# Altium PCB 400921.PcbDoc (part 3 of 3)
Units mm, origin at the board's own origin, x right, y up, seen from the top; angles counter-clockwise.
Board outline 33 x 32.99 mm, 4 copper layers (Top Layer, Mid-Layer 1, Mid-Layer 2, Bottom Layer), stack 0.75 mm thick; 113 components, 68 nets, 329 pads, 369 vias.
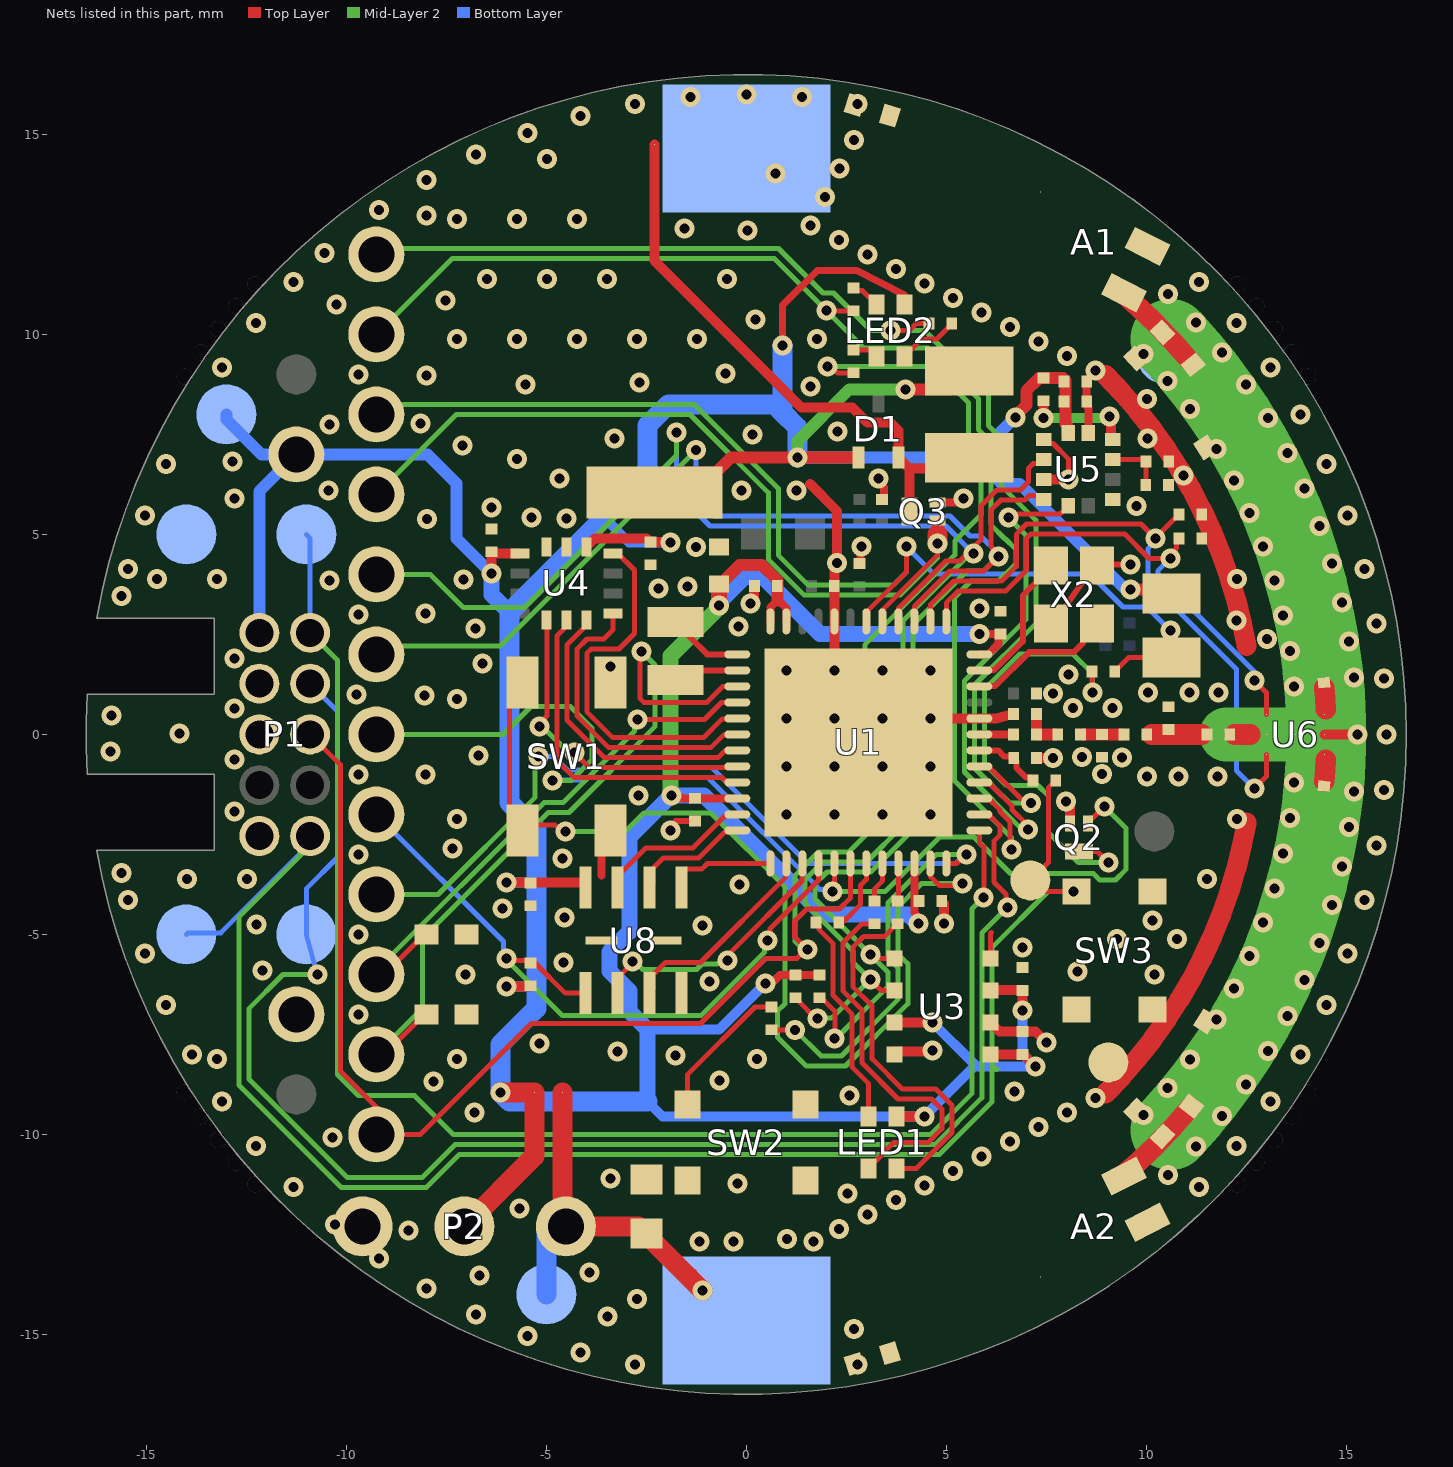
[diagram p4: the nets of this part, all layers, seen from the top]

## Via types
v1: diameter 0.5, hole 0.25, Top Layer to Bottom Layer, tented both sides, 369 vias

## Nets (pads, with @x,y where several pads share a name; then routed paths per layer and width w, separated by ;. In a path a pad name is that pad's centre, name@x,y a point inside that pad or via, vN(x,y) a via of type N, cw(c..) or ccw(c..) an arc to the next point about the centre after c; other vN are vias at no path point) (continued)
GND: A1.2 A2.2 Bat1.2 C1.1 C2.1 C3.1 C4.2 C5.1 C6.1 C7.2 C8.2 C9.1 C10.2 C11.1 C12.1 C13.1 C15.1 C16.1 C17.2 C18.1 C19.2 C20.1 C21.1 C22.1 C23.1 C24.1 C26.1 C27.1 C30.1 C31.1 C38.2 C39.1 C41.1 C42.1 GND.1 P1.3 P1.5 P1.9 P2.3 Q2.2 Q3.2 R8.1 R9.1 SW1.1 SW2.2 SW3.1 TP2.1 TP7.1 TP13.1 U1.32 U1.44 U1.49 U3.1 U3.5 U3.7 U4.6 U4.7 U5.1 U5.3 U5.7 U5.11 U6.5 U6.7 U8.4 U8.9 X2.2 X2.4 | length 63
  Top Layer w0.125: U3.5@6.1,-5.6 6.1,-4.975 6.125,-4.95 ; U5.1@7.44,7.375 7.542,7.273 7.668,7.273 8.05,6.89 v1(8.05,6.375)
  Top Layer w0.15: v1@-1.85,-2.25 -1.766,-2.166 C7.2@-1.287,-2.166 -1.302,-2.166 C7.2@-1.362,-2.226 ; X2.4@7.612,2.779 7.962,3.179 8.412,3.829 X2.2@8.762,4.229 ; X2.2@8.762,4.204 8.808,4.25 v1(9.6,4.25)
  Top Layer w0.2: -3.625,-3.525 -3.625,-2.625 SW1.1@-3.4,-2.4 ; C12.1@2.828,4.272 2.853,4.297 2.853,4.673 v1(2.879,4.698) ; v1(3.3,6.4) 3.3,6.319 3.44,6.179 C2.1@3.44,5.907 ; Q3.2@4.775,5.8 v1@5.425,5.8 ; C22.1@8.51,8.825 C21.1@8.51,8.325 8.545,8.29 8.545,8.163 8.55,8.158 U5.11@8.55,7.535 8.55,8.135
  Top Layer w0.25: v1(0.11,3.276) 0.11,3.343 0.196,3.429 0.196,3.697 C10.2@0.206,3.707 ; 1.59,6.265 2.269,5.587 2.269,4.224 2.21,4.165 2.21,3.719 C1.1@2.2,3.709 U1.44@2.2,2.825 v1(2.2,1.6) ; U3.1@3.7,-7.925 v1@4.65,-7.925 ; U1.49@4.603,0.4 U1.32@5.825,0.4 6.254,0.4 C6.1@6.681,0.514 ; C8.2@4.889,-4.162 4.889,-4.177 4.937,-4.225 v1(4.937,-4.725) ; U3.7@6.1,-7.2 6.33,-7.43 C16.1@6.9,-7.43 7.23,-7.43 v1(7.5,-7.7) ; C13.1@7.258,-0.586 v1@7.661,-0.586 ; U5.3@7.44,6.375 v1(8.05,6.375) ; Q2.2@8.087,-2.225 v1@8.087,-1.739 ; U6.5@14.45,0 v1(15.275,0)
  Top Layer w0.5: 8.98,-8.98 ccw(c0,0) 12.507,-2.205 ; 8.98,8.98 cw(c0,0) 12.507,2.205
  Mid-Layer 2 w1.35: 12.001,0 14.5,0
  Mid-Layer 2 w2: 10.605,-9.889 ccw(c0,0) 10.605,9.889
  other v1: -2.778,-15.757 2.778,-15.757 -4.141,-15.455 -5.472,-15.035 2.689,-14.863 -3.475,-14.55 -6.762,-14.501 -2.732,-14.118 -8,-13.856 -6.675,-13.525 -3.925,-13.45 -9.177,-13.106 -1.175,-12.675 -0.325,-12.675 1.675,-12.675 1.018,-12.618 -8.45,-12.4 2.313,-12.362 -10.285,-12.257 3.026,-11.999 -5.675,-11.85 3.738,-11.635 2.525,-11.475 -11.314,-11.314 11.314,-11.314 4.451,-11.272 -0.225,-11.225 -3.4,-11.1 10.546,-11.016 5.164,-10.909 5.877,-10.546 11.243,-10.303 -12.257,-10.285 12.257,-10.285 6.59,-10.183 -10.35,-10.075 7.303,-9.82 11.893,-9.545 9.932,-9.508 -6.8,-9.45 8.015,-9.456 -13.106,-9.177 13.106,-9.177 8.728,-9.093 2.575,-9.025 6.7,-8.925 10.533,-8.838 12.492,-8.747 -7.825,-8.675 -0.675,-8.65 11.089,-8.13 -13.232,-8.118 -7.232,-8.118 0.268,-8.118 -1.775,-8.025 -13.856,-8 13.856,-8 -3.225,-7.925 4.65,-7.9 13.037,-7.911 -5.175,-7.725 11.755,-7.133 13.527,-7.042 -9.7,-7 -14.501,-6.762 14.501,-6.762 12.196,-6.349 -0.925,-6.175 13.958,-6.142 -7.025,-6 10.2,-6 8.275,-5.925 -12.1,-5.9 -4.575,-5.7 12.586,-5.538 -15.035,-5.472 15.035,-5.472 6.9,-5.325 14.33,-5.216 9.268,-5.118 10.768,-5.118 -9.7,-5 -1.1,-4.775 -12.25,-4.75 12.921,-4.703 10.15,-4.65 -4.55,-4.575 -6.1,-4.35 14.641,-4.267 -15.455,-4.141 15.455,-4.141 13.201,-3.848 -0.175,-3.75 -13.982,-3.618 -12.482,-3.618 11.518,-3.618 -15.621,-3.463 14.888,-3.301 -4.6,-3.1 -9.7,-3 13.424,-2.976 -7.35,-2.85 15.757,-2.778 -1.9,-2.4 15.072,-2.32 -7.232,-2.118 12.268,-2.118 13.59,-2.092 1,-2 2.2,-2 3.4,-2 4.6,-2 -12.8,-1.925 7.988,-1.676 -2.7,-1.525 15.192,-1.429 15.939,-1.394 13.698,-1.198 10.016,-1.05 10.803,-1.05 11.775,-1.05 -9.7,-1 -8.025,-1 8.898,-0.989 1,-0.8 2.2,-0.8 3.4,-0.8 4.6,-0.8 -12.8,-0.625 7.666,-0.591 8.391,-0.56 9.394,-0.571 -6.7,-0.525 -15.9,-0.425 16,0 -14.175,0.025 1,0.4 2.2,0.4 3.4,0.4 4.6,0.4 -15.875,0.475 -12.8,0.65 8.162,0.659 9.152,0.659 -7.232,0.882 -8.05,0.975 -9.75,1 7.666,1.02 10.041,1.05 11.075,1.05 11.8,1.05 13.698,1.198 15.939,1.394 15.192,1.429 8.06,1.498 1,1.6 3.4,1.6 4.6,1.6 -3.4,1.7 -6.6,1.775 -12.8,1.9 13.59,2.092 15.072,2.32 13.018,2.382 -6.775,2.65 -0.2,2.702 15.757,2.778 12.25,2.85 13.424,2.976 -9.7,3 -8.025,3.025 5.825,3.149 14.888,3.301 -15.621,3.463 -2.2,3.65 -1.475,3.7 -10.425,3.85 13.201,3.848 -14.732,3.882 -13.232,3.882 -7.075,3.875 12.268,3.882 -15.455,4.141 15.455,4.141 14.641,4.267 2.269,4.292 -1.263,4.685 12.921,4.703 14.33,5.216 -7.982,5.382 -4.5,5.4 -5.375,5.425 -15.035,5.472 15.035,5.472 12.586,5.538 -6.375,5.675 9.75,5.707 -12.8,5.9 5.425,5.9 -10.45,6.1 -0.125,6.1 1.25,6.1 13.958,6.142 12.196,6.349 -4.675,6.4 10.926,6.474 -14.501,6.762 14.501,6.762 -12.85,6.825 -5.732,6.882 13.527,7.042 11.755,7.133 -7.1,7.225 -3.3,7.4 10.025,7.4 0.15,7.5 2.275,7.575 -10.425,7.75 -8.15,7.775 13.037,7.911 13.856,8 11.089,8.13 10.018,8.382 1.6,8.7 -5.525,8.75 12.492,8.747 -2.675,8.8 10.533,8.838 -8,8.975 -9.7,9 -0.525,9.025 8.728,9.093 -13.106,9.177 -13.106,9.177 13.106,9.177 8.015,9.456 9.932,9.508 11.893,9.545 7.303,9.82 -7.232,9.882 -5.732,9.882 -4.232,9.882 -2.732,9.882 -1.232,9.882 1.768,9.882 6.59,10.183 -12.257,10.285 -12.257,10.285 12.257,10.285 11.243,10.303 0.225,10.375 5.877,10.546 -10.25,10.75 -7.525,10.85 5.164,10.909 10.546,11.016 4.451,11.272 -11.314,11.314 11.314,11.314 -6.482,11.382 -4.982,11.382 -3.482,11.382 -0.482,11.382 3.738,11.635 3.026,11.999 -10.55,12.029 2.313,12.362 0.025,12.6 -1.55,12.65 1.6,12.725 -7.232,12.882 -5.732,12.882 -4.232,12.882 -8,12.975 -9.177,13.106 1.963,13.438 -8,13.856 0.725,14.025 2.326,14.151 -4.982,14.382 -6.762,14.501 2.69,14.863 -5.472,15.035 -4.141,15.455 -2.778,15.757 2.778,15.757 -1.394,15.939 1.394,15.939 0,16
J1: C29.2 U6.6 | length 0.5
  Top Layer w0.517: C29.2@14.453,1.171 cw(c0,0) 14.486,0.634
J2: C25.2 U6.4 | length 0.5
  Top Layer w0.517: C25.2@14.453,-1.171 ccw(c0,0) 14.486,-0.634
NetA1_1: A1.1 C31.2 L7.2 | length 2.5
  Top Layer w0.517: A1.1@9.34,11.091 cw(c0,0) L7.2@11.102,9.327
NetA1_3: A1.3 C42.2
NetA2_1: A2.1 C27.2 C40.2 | length 2.5
  Top Layer w0.517: A2.1@9.34,-11.091 ccw(c0,0) C40.2@11.102,-9.327
NetA2_3: A2.3 C41.2
NetBz1_2: Bz1.2 D1.2 L6.1 Q3.3 | length 14.5
  Top Layer w0.25: Bz1.2@-2.3,14.75 -2.3,11.85 1.375,8.175 2.65,8.175 3.025,7.8 3.6,7.8 3.8,7.6 D1.2@3.8,6.925 4.075,6.65 ; Q3.3@4.075,5.575 4.075,6.65 ; L6.1@5.575,6.915 5.31,6.65 4.075,6.65
NetC6_2: C6.2 L2.2 L3.1 | length 0.9
  Top Layer w0.27: L2.2@7.253,0.014 C6.2@7.253,0.507
  Top Layer w0.3: L2.2@7.28,-0.001 L3.1@7.73,-0.001
NetC9_2: C9.2 L3.2 L4.1 | length 1
  Top Layer w0.3: L3.2@8.391,-0.001 C9.2@8.898,-0.001 L4.1@9.406,-0.001
NetC13_2: C13.2 R1.1 U1.30 | length 1.7
  Top Layer w0.15: U1.30@5.825,-0.4 6.297,-0.4 6.452,-0.555 6.635,-0.555 C13.2@6.685,-0.605 ; C13.2@6.684,-0.613 6.7,-0.613 6.755,-0.669 6.755,-0.74 6.757,-0.742 6.757,-0.843 6.996,-1.082 R1.1@7.136,-1.082
NetL2_1: L2.1 U1.31 | length 0.9
  Top Layer w0.2: U1.31@5.825,0 6.682,0 L2.1@6.683,-0.001
NetLED1_1: LED1.1 R13.2 | length 5.4
  Top Layer w0.125: R13.2@1.74,-4.7 1.812,-4.772 1.812,-4.871 2.162,-5.221 2.162,-6.513 2.646,-6.997 2.646,-8.318 3.05,-8.722 LED1.1@3.05,-9.55
NetLED1_2: LED1.2 R12.2 | length 9.3
  Top Layer w0.125: LED1.2@3.75,-10.85 4.25,-10.85 5.138,-9.962 5.138,-9.265 4.735,-8.862 3.897,-8.862 3.146,-8.111 3.146,-6.79 2.662,-6.306 2.662,-5.944 2.662,-5.319 2.919,-5.062 2.935,-5.062 2.94,-5.058 3.453,-5.058 3.688,-4.822 3.688,-4.807 3.76,-4.735 R12.2@3.775,-4.735
NetLED1_3: LED1.3 R11.2 | length 9.4
  Top Layer w0.125: LED1.3@3.05,-10.85 3.05,-10.8 3.187,-10.662 3.238,-10.662 3.362,-10.538 3.362,-10.522 3.685,-10.2 4.546,-10.2 4.887,-9.859 4.887,-9.369 4.631,-9.113 3.794,-9.113 2.896,-8.215 2.896,-6.893 2.412,-6.41 2.412,-5.215 2.893,-4.735 R11.2@3.2,-4.735
NetLED2_1: LED2.1 R16.2 | length 0.8
  Top Layer w0.125: R16.2@2.675,11.16 2.743,11.092 2.908,11.092 3.063,10.937 3.113,10.937 3.25,10.8 LED2.1@3.25,10.75
NetLED2_2: LED2.2 R15.2 | length 1.8
  Top Layer w0.125: LED2.2@3.95,9.45 3.95,9.5 4.088,9.637 4.138,9.637 4.215,9.715 ; 4.215,9.715 4.387,9.888 4.68,9.888 ; 4.748,9.888 4.68,9.888 ; R15.2@5.048,10.188 5.063,10.188 R15.2@5.135,10.26 ; R15.2@5.135,10.275 R15.2@5.135,10.26 ; 4.68,9.888 4.763,9.888 R15.2@5.135,10.26
NetLED2_3: LED2.3 R14.2 | length 0.8
  Top Layer w0.125: R14.2@2.675,9.61 3.113,9.61 3.25,9.473 LED2.3@3.25,9.45 LED2.3@3.365,9.335
NetQ2_3: Q2.3 R4.1 | length 11.6
  Top Layer w0.125: Q2.3@8.3,-2.925 8.775,-2.925 v1(9.05,-3.2) ; R4.1@8.64,1.575 8.64,1.06 v1(8.65,1.05)
  Mid-Layer 2 w0.125: v1(8.65,1.05) 8.65,1.527 8.165,2.011 6.836,2.011 5.957,1.132 5.957,-0.734 6.5,-1.277 7.294,-1.277 7.55,-1.533 7.55,-2.45 8.3,-3.2 v1(9.05,-3.2)
NetR5_2: R5.2 U5.10 | length 2.7
  Top Layer w0.25: v1(7.425,7.915) R5.2@7.425,8.34 ; v1(9.075,7.95) 9.121,7.904 9.121,7.414 U5.10@9.16,7.375
  Mid-Layer 2 w0.25: v1(7.425,7.915) 9.04,7.915 v1(9.075,7.95)
NetR19_1: R19.1 SW2.1 | length 3.5
  Top Layer w0.125: SW2.1@-1.475,-9.25 -1.475,-8.506 0.216,-6.815 R19.1@0.625,-6.815
P0.00: SW1.2 U1.23 | length 25.3
  Top Layer w0.125: SW1.2@-5.6,1.3 -5.925,0.975 -5.925,-2.075 SW1.2@-5.6,-2.4 -5.461,-2.261 -4.786,-2.261 -4.621,-2.425 v1(-4.525,-2.425) ; U1.23@4.609,-3.234 4.609,-3.559 4.827,-3.777 5.348,-3.777 v1(5.4,-3.725)
  Mid-Layer 2 w0.125: v1(-4.525,-2.425) -3.025,-2.425 -2.562,-1.962 -0.886,-1.962 0.962,-3.811 0.962,-6.738 0.778,-6.922 0.778,-7.566 1.502,-8.291 2.482,-8.291 4.037,-6.735 4.037,-5.73 3.788,-5.48 3.788,-4.318 4.38,-3.725 v1(5.4,-3.725)
P0.01: 0.01.1 R19.2 U1.24 | length 27.6
  Top Layer w0.125: R19.2@0.625,-7.385 v1(1.216,-7.385) ; U1.24@5,-3.225 5.254,-3.225 5.479,-3 v1(5.5,-3)
  Mid-Layer 2 w0.125: 0.01.1@-9.25,-4 -7.707,-4 -5.288,-1.58 -5.288,-0.638 v1(-5.2,-0.55) ; v1(1.216,-7.385) 1.871,-8.041 2.3,-8.041 2.303,-8.038 2.381,-8.038 3.787,-6.631 3.787,-5.834 3.537,-5.584 3.537,-4.214 4.752,-3 v1(5.5,-3)
  Bottom Layer w0.125: v1(-5.2,-0.55) -4.819,-0.55 -4.481,-0.888 -4.119,-0.888 -4.062,-0.831 -0.856,-0.831 1.538,-3.225 5.239,-3.225 5.464,-3 v1(5.5,-3)
P0.02: 0.02.1 R16.1 U1.27 | length 33
  Top Layer w0.125: v1@2,10.59 R16.1@2.675,10.59 ; U1.27@5.825,-1.6 6.057,-1.6 6.337,-1.881 6.337,-1.927 6.587,-2.177 6.587,-2.838 v1(6.625,-2.875)
  Mid-Layer 2 w0.125: 0.02.1@-9.25,10 -7.35,11.9 0.7,11.9 v1(2,10.6) 2.938,9.662 4.538,9.662 5.8,8.4 5.8,7.621 6.113,7.309 6.113,5.244 6.469,4.888 6.481,4.888 6.737,4.631 6.737,4.269 6.306,3.837 5.62,3.837 5.207,3.425 5.207,-1.157 6.625,-2.575 v1(6.625,-2.875)
P0.03: U1.28 U5.5 | length 12.8
  Top Layer w0.125: U1.28@5.835,-1.21 U1.28@5.825,-1.2 6.048,-1.2 6.161,-1.312 6.169,-1.312 6.639,-1.782 6.639,-1.875 7.037,-2.274 v1(7.037,-2.381) ; v1(6.55,5.425) 6.634,5.509 7.844,5.509 7.917,5.583 7.947,5.583 8.05,5.685 U5.5@8.05,5.715
  Mid-Layer 2 w0.125: v1(6.55,5.425) 6.988,4.988 6.988,2.87 5.457,1.339 5.457,-0.941 6.897,-2.381 v1(7.037,-2.381)
P0.04: 0.04.1 R15.1 U1.29 | length 32.1
  Top Layer w0.125: v1(3.6,10.1) 4.075,10.1 4.25,10.275 R15.1@4.565,10.275 ; U1.29@5.825,-0.8 6.05,-0.8 6.162,-0.912 6.169,-0.912 6.933,-1.676 7.226,-1.676 v1@7.264,-1.714
  Mid-Layer 2 w0.125: 0.04.1@-9.25,12 -9.1,12.15 0.804,12.15 1.916,11.038 2.181,11.038 3.119,10.1 v1(3.6,10.1) 4.454,10.1 6.05,8.504 6.05,7.725 6.363,7.412 6.363,6.231 7.238,5.356 7.238,2.766 5.707,1.235 5.707,-0.837 6.584,-1.714 v1@7.287,-1.714
  other v1: 7.112,-1.714
P1.00/XL1: U1.1 X1.2 | length 2.1
  Top Layer w0.15: X1.2@-1.998,2.781 -1.749,2.781 -1.399,2.431 -1.399,2.422 -0.977,2 U1.1@-0.225,2
P1.01/XL2: U1.2 X1.1 | length 1.9
  Top Layer w0.15: X1.1@-2.024,1.281 -1.699,1.281 -1.379,1.6 U1.2@-0.225,1.6
P1.02/NFC1: 1.02.1 C17.1 U1.3 | length 18.9
  Top Layer w0.125: 1.02.1@-9.25,-8 -9.05,-8 -8.05,-7 C17.1@-8,-7 ; v1@-2.674,2.051 v1@-2.65,2.075 ; v1@-2.661,2.039 -2.661,0.903 -2.551,0.793 -0.996,0.793 -0.589,1.2 U1.3@-0.225,1.2
  Mid-Layer 2 w0.125: 1.02.1@-9.25,-8 -8.1,-6.85 -8.1,-5.1 -4.95,-1.95 -4.431,-1.95 -2.287,0.194 -2.287,0.622 -2.284,0.625 -2.284,1.734 v1(-2.625,2.075)
P1.03/NFC2: 1.03.1 C19.1 U1.4 | length 13.7
  Top Layer w0.125: 1.03.1@-9.25,-6 -9.05,-6 -8.05,-5 C19.1@-8,-5 ; v1(-2.725,0.375) -1.045,0.375 -0.62,0.8 U1.4@-0.225,0.8
  Mid-Layer 2 w0.125: 1.03.1@-9.25,-6 -9.25,-5.896 -5.054,-1.7 -4.578,-1.7 -2.797,0.081 -2.797,0.303 v1(-2.725,0.375)
P1.04: U1.5 U4.4 | length 9.4
  Top Layer w0.125: U4.4@-3.338,4.525 -3.21,4.525 -2.794,4.109 -2.794,2.525 -3.181,2.138 -3.878,2.138 -3.988,2.028 -3.988,0.57 -3.337,-0.081 -1.069,-0.081 -0.597,0.391 U1.5@-0.234,0.391
P1.05: U1.6 U4.1 | length 7.6
  Top Layer w0.125: U4.1@-3.337,3 -3.337,2.613 -3.562,2.388 -3.981,2.388 -4.238,2.131 -4.238,0.466 -3.44,-0.331 -0.887,-0.331 -0.565,-0.009 U1.6@-0.234,-0.009
P1.06: U1.7 U4.14 | length 7.4
  Top Layer w0.125: U4.14@-4,2.813 -4,2.722 -4.488,2.235 -4.488,0.363 -3.544,-0.581 -0.705,-0.581 -0.533,-0.409 U1.7@-0.234,-0.409
P1.07: U1.8 U4.12 | length 8.1
  Top Layer w0.125: v1(-5.175,0.2) -5.175,0.273 -4.988,0.461 U4.12@-4.988,2.825 ; v1(-4.3,-0.45) -3.919,-0.831 -0.256,-0.831 U1.8@-0.225,-0.8
  Mid-Layer 2 w0.125: v1(-5.175,0.2) -5.1,0.2 -4.522,-0.378 -4.372,-0.378 v1(-4.3,-0.45)
P1.08: U1.9 U4.13 | length 8.3
  Top Layer w0.125: U4.13@-4.5,2.863 -4.5,2.7 -4.738,2.462 -4.738,-0.644 -4.3,-1.081 -0.594,-1.081 -0.475,-1.2 U1.9@-0.225,-1.2
P1.09: R8.2 U1.37 U6.1 | length 13.2
  Top Layer w0.125: U1.37@5,2.825 5,3.289 5.298,3.587 6.486,3.587 7,4.1 7,4.9 7.108,5.009 9.46,5.009 10.069,4.4 v1(10.6,4.4) 10.6,4.501 10.754,4.656 10.754,4.839 R8.2@10.815,4.9 ; v1(12.7,1.35) 13,1.05 U6.1@13,0.5
  Bottom Layer w0.125: v1(10.6,4.4) 10.289,4.089 10.289,3.986 12.7,1.575 v1(12.7,1.35)
P1.10: R9.2 U1.38 U6.3 | length 16.8
  Top Layer w0.125: U1.38@4.6,2.825 4.6,3.242 5.194,3.837 6.383,3.837 6.75,4.203 6.75,5.003 7.005,5.259 9.866,5.259 v1(10.225,4.9) 10.225,4.91 10.728,5.413 10.743,5.413 10.815,5.485 R9.2@10.815,5.5 ; v1(12.7,-1.35) 13,-1.05 U6.3@13,-0.5
  Bottom Layer w0.125: v1(10.225,4.9) 10.225,4.827 10.038,4.639 10.038,3.847 12.25,1.634 12.25,-0.9 v1(12.7,-1.35)
P1.11: 1.11.1 R3.1 U1.39 U3.4 U5.4 | length 43.7
  Top Layer w0.125: R3.1@1.825,-6.585 1.898,-6.658 1.951,-6.658 2.213,-6.919 v1@2.213,-7.587 ; v1@3.1,-5.6 v1@3.301,-5.6 ; v1(3.1,-5.5) 3.201,-5.5 v1@3.301,-5.6 ; U3.4@3.7,-5.6 v1@3.301,-5.6 ; U1.39@4.2,2.825 4.2,3.196 5.091,4.087 5.939,4.087 6.128,4.275 6.2,4.275 6.2,4.376 v1@6.287,4.463 ; v1(6.3,4.45) 6.3,4.523 6.113,4.711 6.113,5.606 6.369,5.863 6.958,5.863 7.07,5.975 7.315,5.975 7.428,5.863 U5.4@7.44,5.875
  Mid-Layer 2 w0.125: 1.11.1@-9.25,2 -9.25,2.213 -6.154,2.213 v1(-1.258,7.108) ; v1(2.2,-7.6) 2.244,-7.6 3.537,-6.306 3.537,-5.937 v1(3.1,-5.5) 2.8,-5.2 2.8,-5.196 2.654,-5.05 2.65,-5.05 1.712,-4.112 1.712,-3.744 2.017,-3.44 3.11,-3.44 4.162,-2.388 4.162,2.734 5.516,4.087 5.937,4.087 v1(6.3,4.45)
  Bottom Layer w0.125: v1(-1.258,7.108) -1.258,5.912 -0.805,5.459 5.095,5.459 5.591,4.962 5.856,4.962 6.3,4.519 v1(6.3,4.45)
P1.12: 1.12.1 R2.1 U1.40 U3.3 U5.2 | length 42.7
  Top Layer w0.125: R2.1@1.225,-6.585 1.24,-6.585 1.312,-6.658 1.312,-6.673 v1@1.74,-7.1 ; v1@1.763,-7.112 v1(1.775,-7.1) ; v1(3.1,-6.125) 3.375,-6.4 U3.3@3.7,-6.4 ; U1.40@3.8,2.825 3.8,3.149 4.987,4.337 5.333,4.337 5.45,4.453 5.502,4.453 5.598,4.55 5.598,4.602 5.863,4.866 5.863,5.71 6.265,6.113 6.854,6.113 7.057,6.316 7.057,6.657 7.173,6.773 7.337,6.773 U5.2@7.44,6.875
  Mid-Layer 2 w0.125: 1.12.1@-9.25,4 -7.9,4 -7.075,3.175 -5.545,3.175 -1.746,6.974 v1(-1.746,7.546) ; v1(1.775,-7.1) 1.784,-7.091 2.134,-7.091 v1(3.1,-6.125) 2.662,-5.687 2.662,-5.416 1.462,-4.216 1.462,-3.638 1.91,-3.19 3.007,-3.19 3.912,-2.284 3.912,2.837 5.6,4.525 v1(5.675,4.525)
  Bottom Layer w0.125: v1(-1.746,7.546) -1.746,6.046 -0.909,5.209 4.991,5.209 v1(5.675,4.525)
P1.13: 1.13.1 Q3.1 U1.41 | length 21.2
  Top Layer w0.125: U1.41@3.4,2.825 3.4,3.103 4.775,4.478 v1(4.775,4.771)
  Top Layer w0.5: v1(4.775,4.771) v1@4.775,5
  Mid-Layer 2 w0.125: 1.13.1@-9.25,6 -7.25,8 -1.406,8 0.55,6.044 0.55,4.378 1.447,3.481 3.849,3.481 4.775,4.407 v1(4.775,4.771)
P1.14: 1.14.1 Q1.E R4.2 U1.42 | length 28.3
  Top Layer w0.125: U1.42@3,2.825 3,3.057 4,4.057 v1(4,4.7) ; R4.2@9.21,1.575 9.21,1.59 9.282,1.663 9.297,1.663 9.56,1.925 Q1.E@10.625,1.925
  Mid-Layer 2 w0.125: 1.14.1@-9.25,8 -9,8.25 -1.303,8.25 0.8,6.147 0.8,4.481 1.551,3.731 3.669,3.731 4,4.061 v1(4,4.7)
  Bottom Layer w0.125: v1(4,4.7) 4.687,4.013 8.594,4.013 9.419,3.188 10.012,3.188 v1(10.6,2.6)
P2.00: U1.11 U8.7 | length 4.2
  Top Layer w0.125: U8.7@-3.275,-4.054 -3.275,-3.6 -2.513,-2.838 -1.338,-2.838 -0.537,-2.037 -0.508,-2.037 -0.47,-2 U1.11@-0.225,-2
P2.01: U1.12 U8.6 | length 3
  Top Layer w0.125: U8.6@-2.425,-3.83 -2.337,-3.743 -2.337,-3.352 -2.073,-3.088 -1.188,-3.088 -0.537,-2.437 -0.508,-2.437 -0.47,-2.4 U1.12@-0.225,-2.4
P2.02: U1.13 U8.5 | length 2.7
  Top Layer w0.125: U8.5@-1.625,-3.83 -1.625,-3.457 -1.537,-3.37 -1.116,-3.37 -0.971,-3.225 U1.13@0.6,-3.225
P2.03: U1.14 U8.3 | length 5.5
  Top Layer w0.125: U8.3@-2.425,-6.47 -2.337,-6.383 -2.337,-6.008 -2.333,-6.008 -2.025,-5.7 -1.146,-5.7 0.986,-3.569 0.986,-3.239 U1.14@1,-3.225 U1.14@1,-3.508
P2.04: U1.15 U8.2 | length 6.7
  Top Layer w0.125: U8.2@-3.225,-6.47 -3.225,-6.095 -2.85,-5.72 v1(-2.85,-5.675) ; v1(-0.475,-5.65) -0.403,-5.578 -0.403,-5.46 1.394,-3.663 1.394,-3.231 U1.15@1.4,-3.225
  Mid-Layer 2 w0.125: v1(-2.85,-5.675) -2.789,-5.675 -2.589,-5.875 -1.244,-5.875 -1.106,-5.737 -0.736,-5.737 -0.72,-5.722 -0.547,-5.722 v1(-0.475,-5.65)
P2.05: 2.05.1 R17.1 U1.16 U8.1 | length 17.8
  Top Layer w0.125: v1(-6,-5.6) -5.943,-5.657 -5.458,-5.657 R17.1@-5.4,-5.715 -5.28,-5.715 -4.525,-6.47 U8.1@-4.025,-6.47 ; v1(0.525,-5.15) 0.597,-5.078 0.597,-4.853 1.8,-3.65 U1.16@1.8,-3.225
  Mid-Layer 2 w0.125: v1(-6,-5.6) -6,-5.625 -4.6,-7.025 -1.125,-7.025 0.453,-5.447 0.453,-5.222 v1(0.525,-5.15)
  Bottom Layer w0.125: 2.05.1@-9.25,-2 -6.072,-5.178 -6.072,-5.528 v1(-6,-5.6)
P2.06: 2.06.1 Q2.1 U1.17 | length 27.7
  Top Layer w0.125: v1(2.15,-3.925) 2.2,-3.875 U1.17@2.2,-3.225 ; Q2.1@8.525,-2.225 8.525,-2.15 8.588,-2.088 8.662,-2.088 v1(8.95,-1.8)
  Mid-Layer 2 w0.125: 2.06.1@-9.25,0 -6.083,0 -5.383,0.7 -4.4,0.7 -3.862,0.162 -3.862,-0.631 -4.381,-1.15 v1(-4.85,-1.15) ; v1(2.15,-3.925) 3.473,-3.925 4.836,-2.562 5.694,-2.562 6.606,-3.475 8.675,-3.475 8.838,-3.638 9.231,-3.638 9.488,-3.381 9.488,-2.338 v1(8.95,-1.8)
  Bottom Layer w0.125: v1(-4.85,-1.15) -4.838,-1.138 -4.015,-1.138 -3.959,-1.081 -0.959,-1.081 1.833,-3.873 2.098,-3.873 v1(2.15,-3.925)
P2.07: 2.07.1 P1.6 R14.1 U1.18 | length 47.7
  Top Layer w0.125: P1.6@-10.905,0 -10.15,-0.755 -10.15,-8.414 -9.25,-9.314 2.07.1@-9.25,-10 -8.15,-10 -5.375,-7.225 -1.144,-7.225 0.481,-5.6 1.264,-5.6 1.489,-5.375 v1(1.525,-5.375) 1.2,-5.05 1.2,-4.675 1.512,-4.363 2.331,-4.363 2.6,-4.094 U1.18@2.6,-3.225 ; v1(2.025,9.2) 2.126,9.2 2.286,9.04 R14.1@2.675,9.04
  Mid-Layer 2 w0.125: v1(1.525,-5.375) 1.424,-5.375 1.294,-5.246 1.286,-5.246 1.212,-5.172 1.212,-3.534 1.807,-2.94 2.56,-2.94 2.962,-2.538 2.962,2.241 5.213,4.491 5.213,4.838 5.863,5.487 5.863,7.205 5.55,7.518 5.55,8.296 4.646,9.2 v1(2.025,9.2)
P2.08: R13.1 U1.19 | length 2
  Top Layer w0.125: R13.1@2.31,-4.7 2.31,-4.685 2.382,-4.613 2.496,-4.613 ; R13.1@2.352,-4.757 2.496,-4.613 ; U1.19@3,-3.225 3,-3.625 2.85,-3.775 2.85,-4.258 2.496,-4.613
P2.09: R11.1 U1.20 | length 1
  Top Layer w0.125: R11.1@3.2,-4.165 3.2,-3.868 3.4,-3.668 U1.20@3.4,-3.225
P2.10: R12.1 U1.21 | length 0.9
  Top Layer w0.125: R12.1@3.8,-4.14 U1.21@3.8,-3.225
RESET: P1.10 R1.2 SW3.2 TP3.1 TP12.1 | length 43.4
  Top Layer w0.125: R1.2@7.736,-1.152 7.55,-1.337 7.55,-3.2 TP12.1@7.1,-3.65 7.375,-3.925 v1(8.175,-3.925)
  Mid-Layer 2 w0.125: 6.263,-8.382 6.137,-8.257 ; v1(8.175,-3.925) 7.544,-3.925 6.137,-5.331 6.137,-8.257 ; -11.163,-3.044 -10.905,-2.786 P1.10@-10.905,-2.54 -11.163,-2.798 -11.163,-3.044 ; -11.163,-3.044 -12.688,-4.569 -12.688,-8.762 -10.125,-11.325 -8,-11.325 -7.175,-10.5 4.826,-10.5 6.137,-9.188 6.137,-8.257
  Bottom Layer w0.125: TP3.1@-14,-5 -13.961,-4.961 -13.136,-4.961 P1.10@-10.905,-2.73 ; P1.10@-10.905,-2.73 P1.10@-10.905,-2.54 P1.10@-10.905,-2.73
RF: C11.2 C28.2 L4.2 | length 1.3
  Top Layer w0.517: L4.2@10.138,0 C28.2@11.39,0
RFC: C28.1 U6.2 | length 0.4
  Top Layer w0.517: C28.1@12.21,0 12.6,0
SWDCLK: P1.4 TP4.1 U1.26 | length 39.8
  Top Layer w0.125: U1.26@5.825,-2 6.057,-2 6.337,-2.281 6.337,-2.519 6.188,-2.669 6.188,-3.688 6.49,-3.991 6.49,-4.29 v1(6.525,-4.325)
  Mid-Layer 2 w0.125: v1(-10.725,-6) -11.581,-6 -12.438,-6.856 -12.438,-8.612 -9.975,-11.075 -8.104,-11.075 -7.279,-10.25 4.722,-10.25 5.887,-9.085 5.887,-4.963 v1(6.525,-4.325)
  Bottom Layer w0.125: P1.4@-10.905,1.27 -10.217,0.582 -10.217,-3.075 -11,-3.858 TP4.1@-11,-5 v1(-10.725,-6)
SWDIO: P1.2 TP5.1 U1.25 | length 37.6
  Top Layer w0.125: U1.25@5.825,-2.4 5.825,-2.706 5.938,-2.819 5.938,-4.062 v1(5.925,-4.075)
  Mid-Layer 2 w0.125: P1.2@-10.905,2.54 -10.217,1.852 -10.217,-6.621 -10.217,-8.508 -9.7,-9.025 -8.3,-9.025 -7.325,-10 4.619,-10 5.637,-8.981 5.637,-4.363 v1(5.925,-4.075)
  Bottom Layer w0.125: P1.2@-10.905,2.54 TP5.1@-10.905,4.905 ; TP5.1@-10.905,4.905 TP5.1@-11,5 TP5.1@-10.905,4.905
VBAT: Bat1.1 C39.2 P2.1 SB1.1 TP6.1 | length 9.6
  Top Layer w0.5: SB1.1@-4.599,-8.955 -4.599,-12.211 P2.1@-4.51,-12.3 -2.7,-12.3 -1.438,-13.563 ; -1.775,-13.225 -1.438,-13.563 ; v1(-1.1,-13.9) -1.438,-13.563
  Bottom Layer w0.5: TP6.1@-5,-14 -4.992,-13.992 P2.1@-4.992,-12.3
VDD: Bz1.1 C3.2 C4.1 C7.1 C8.1 C10.1 C15.2 C16.2 C18.2 C20.2 C21.2 C22.2 C38.1 D1.1 L6.2 LED1.4 LED2.4 P1.1 P2.2 Q1.C R2.2 R3.2 R5.1 R17.2 SB1.2 TP1.1 U1.10 U1.22 U1.36 U1.47 U1.48 U3.2 U3.6 U3.8 U4.5 U4.8 U5.12 U8.8 VDD.1 | length 149.4
  Top Layer w0.125: U3.6@6.1,-6.4 U3.6@6.108,-6.392
  Top Layer w0.175: v1(0.9,9.725) 0.9,10.725 1.776,11.601 2.754,11.601 ; 2.754,11.601 LED2.4@3.95,10.992 ; LED2.4@3.95,10.75 LED2.4@3.951,10.991
  Top Layer w0.2: v1(-1.875,-1.525) -1.818,-1.582 -1.625,-1.582 -1.608,-1.6 U1.10@-0.225,-1.6 ; v1(0.475,-6.225) 0.532,-6.168 0.69,-6.168 0.842,-6.015 R2.2@1.225,-6.015 R3.2@1.825,-6.015 ; U1.48@0.6,2.825 0.6,3.176 0.776,3.352 0.791,3.368 1,3.159 U1.47@1,2.825 ; U1.22@4.2,-3.225 4.2,-4.458 4.244,-4.502 4.244,-4.668 v1(4.301,-4.725) ; U1.36@5.825,2 6.05,2 6.05,2.002 6.308,2.26 C4.1@6.308,2.448 ; v1(5.825,2.514) 5.834,2.505 6.321,2.505 C4.1@6.343,2.483
  Top Layer w0.25: v1(-6.375,4.025) C20.2@-6.375,4.565 ; C20.2@-6.3,4.525 U4.8@-5.663,4.525 ; v1(-6,-6.3) -5.415,-6.3 R17.2@-5.4,-6.285 ; v1(-6,-3.7) U8.8@-4.155,-3.7 ; U4.5@-4,4.688 -3.788,4.9 -2.49,4.9 C18.2@-2.4,4.81 -1.91,4.81 v1(-1.9,4.8) ; U3.2@3.7,-7.2 v1(4.65,-7.2) ; LED1.4@3.75,-9.55 v1(4.45,-9.55) ; U3.8@6.1,-8 6.5,-8 C16.2@6.9,-8 6.925,-8 v1(7.225,-8.3) ; U3.6@6.108,-6.392 6.893,-6.392 C15.2@6.9,-6.4 v1(6.9,-6.9)
  Top Layer w0.3: Bz1.1@-2.3,6.05 -1.8,6.55 -0.75,6.55 -0.375,6.925 v1(1.281,6.925) D1.1@2.8,6.925 ; C3.2@-0.677,3.723 -0.165,4.235 0.39,4.235 0.776,3.85 C10.1@0.776,3.707 0.776,3.352 ; v1(3.975,8.625) 5.115,8.625 L6.2@5.575,9.085 ; v1(6.725,7.925) 6.725,7.957 7,8.232 7,8.589 7.321,8.91 R5.1@7.425,8.91 7.915,8.91 7.975,8.85 7.975,7.756 8.035,7.696 8.035,7.55 U5.12@8.05,7.535 ; v1(9.6,3.625) Q1.C@10.6,3.625 ; Q1.C@10.6,3.5 Q1.C@10.625,3.525
  Top Layer w0.4: v1(-0.677,3.222) C3.2@-0.677,3.723
  Top Layer w0.5: P2.2@-7.05,-12.3 -5.299,-10.549 SB1.2@-5.299,-8.955 -5.304,-8.95 v1(-6.15,-8.95)
  Mid-Layer 2 w0.3: v1(1.281,6.925) 1.281,7.331 2.575,8.625 v1(3.975,8.625)
  Mid-Layer 2 w0.4: v1@-1.897,-1.525 -1.897,1.955 v1@-0.697,3.155
  Bottom Layer w0.25: v1(-6,-6.3) -5.289,-6.3 ; v1(-6,-3.7) -5.289,-3.7 ; -5.25,-3.106 -5.244,-3.1 ; -3.552,5.423 -2.93,4.8 v1(-1.9,4.8) ; -2.469,-9.175 -2.094,-9.55 v1(4.45,-9.55) 5.7,-8.3 ; -2.469,-7.381 -0.681,-7.381 v1(0.475,-6.225) ; v1(4.65,-7.2) 4.657,-7.2 5.7,-8.243 5.7,-8.3 ; v1(6.9,-6.9) 6.9,-7.975 v1(7.225,-8.3) 5.7,-8.3
  Bottom Layer w0.3: TP1.1@-13,8 -13,7.875 -12.125,7 VDD.1@-11.25,7 ; P1.1@-12.175,2.54 -12.175,6.075 VDD.1@-11.25,7 ; v1(-6.375,4.025) -7.25,4.9 -7.25,6.275 -7.975,7 VDD.1@-11.25,7 ; v1(1.281,6.925) 5.725,6.925 ; v1(6.725,7.925) 5.725,6.925 ; v1(9.6,3.625) 9.475,3.625 6.835,6.265 6.385,6.265 5.725,6.925
  Bottom Layer w0.4: v1(-6.375,4.025) -6.375,3.5 -5.925,3.05 ; -2.469,-9.175 -2.469,-7.381 -2.925,-6.925 -2.925,-6.413 -3.425,-5.913 -3.425,-5.437 -2.925,-4.937 -2.925,-2.575 v1(-1.875,-1.525) -1.063,-1.525 1.912,-4.5 4.049,-4.5 4.274,-4.725 v1(4.301,-4.725) ; v1(-0.677,3.222) -0.677,3.301 -0.043,3.936 0.415,3.936 1.837,2.514 v1(5.825,2.514)
  Bottom Layer w0.5: -5.244,-2.381 -5.25,-2.375 ; -2.469,-9.175 -5.925,-9.175 v1(-6.15,-8.95) -6.15,-7.75 -5.25,-6.85 -5.25,-3.106 -5.25,-2.375 ; v1(0.9,9.725) 0.9,8.056 ; v1(1.281,6.925) 1.281,7.675 0.9,8.056 ; -5.25,-2.375 -5.585,-2.04 -5.925,-1.7 -5.925,3.05 -3.552,5.423 -2.475,6.5 -2.475,7.725 -1.95,8.25 0.706,8.25 0.9,8.056
VREG: C23.2 C24.2 U5.9 | length 1.4
  Top Layer w0.125: U5.9@9.16,6.875 9.923,6.875 C23.2@9.981,6.816 ; C24.2@9.988,6.24 9.988,6.823 C23.2@9.99,6.825
XC1: U1.34 X2.1 | length 3.6
  Top Layer w0.15: U1.34@5.886,1.21 6.223,1.21 7.07,2.056 8.187,2.056 8.412,2.281 8.412,2.429 X2.1@8.762,2.779
XC2: U1.35 X2.3 | length 3.6
  Top Layer w0.15: U1.35@5.825,1.6 5.835,1.61 6.198,1.61 6.917,2.328 6.917,3.479 7.262,3.824 7.262,3.879 X2.3@7.612,4.229
pads on no net: D1.3 Fid1.0 Fid2.0 Fid3.0 P1.7 P1.8 U4.2 U4.3 U4.9 U4.10 U4.11 U5.6 U5.8

## Polygon pours and split planes (outlines as drawn)
GND on Mid-Layer 2 "Mid_Layer_2-GND" (solid, remove dead copper, pour order 9): -42.935,-24.525 -42.935,21.195 40.885,21.195 40.885,-24.525
GND on Mid-Layer 1 "Mid_Layer_1-GND" (solid, remove dead copper, pour order 7): -41.629,-23.87 -41.629,21.85 41.379,21.85 41.379,-23.87
GND on Bottom Layer "Bottom_Layer-GND" (solid, remove dead copper, pour order 6): -44.41,-23.325 -44.41,22.395 39.41,22.395 39.41,-23.325
GND on Top Layer "Top_Layer-GND" (solid, remove dead copper, pour order 8): -48.485,-22.5 -48.485,23.22 35.335,23.22 35.335,-22.5

## Keep-outs
Mid-Layer 1:
  circle w0.254: c-4.95,-8.95 r0.619
  lines w0.7: 7.25,-12.557 ccw(c0,0) 7.25,12.557 ; 11.101,-0.001 12.9,0

## Other copper
Top Layer:
  region net GND: 8.212,-2.425 8.212,-1.625 7.737,-1.625 7.737,-2.425
  region net P2.06: 8.888,-2.425 8.888,-1.625 8.413,-1.625 8.413,-2.425
  region net NetQ2_3: 8.888,-3.325 8.888,-2.725 7.737,-2.725 7.737,-3.325
  rectangle net NetBz1_2: 3.675,5.1 4.275,6.05
  rectangle net P1.13: 4.575,5 5.375,5.475
  rectangle net GND: 4.575,5.675 5.375,6.15
  region net GND: 9.07,9.209 1.942,12.841 1.711,12.387 8.839,8.755
  region net GND: 2.695,15.442 1.257,12.619 1.711,12.387 3.149,15.21
  region net GND: 3.149,-15.21 1.711,-12.387 1.257,-12.618 2.695,-15.442
  region net GND: 8.839,-8.755 1.711,-12.387 1.942,-12.841 9.07,-9.209
  region net J1: 14.579,1.446 14.586,1.44 cw(c14.366,1.176) 14.708,1.207 14.458,1.179 14.43,1.429
  region net J1: 14.281,1.413 14.275,1.406 ccw(c14.544,1.182) 14.195,1.151 14.458,1.179 14.43,1.429
  region net ANT1: 14.248,1.711 14.241,1.717 cw(c14.455,1.994) 14.108,1.949 14.37,1.978 14.397,1.728
  region net ANT1: 14.547,1.744 14.552,1.751 ccw(c14.28,1.961) 14.621,2.005 14.37,1.978 14.397,1.728
  region net J1: 14.228,0.637 14.228,0.551 ccw(c14.451,0.551) 14.293,0.393 ccw(c14.338,0.437) 14.338,0.375 14.625,0.375 14.651,0.401 ccw(c14.425,0.626) 14.744,0.626 ccw(c14.717,0.599) 14.717,0.637
  region net J2: 14.228,-0.637 14.228,-0.551 cw(c14.451,-0.551) 14.293,-0.393 cw(c14.338,-0.437) 14.338,-0.375 14.625,-0.375 14.651,-0.401 cw(c14.425,-0.626) 14.744,-0.626 cw(c14.717,-0.599) 14.717,-0.637
  pour cut-out: 7.454,-12.911 cw(c7.25,-12.557) 7.046,-12.203 ccw(c0,0) 14.091,0 ccw(c0,0) 7.046,12.203 cw(c7.25,12.557) 7.454,12.911 cw(c0,0) 14.909,0 cw(c0,0)
  region net ANT2: 14.547,-1.744 14.552,-1.751 cw(c14.28,-1.961) 14.621,-2.005 14.37,-1.978 14.397,-1.728
  region net ANT2: 14.248,-1.711 14.241,-1.717 ccw(c14.455,-1.994) 14.108,-1.949 14.37,-1.978 14.397,-1.728
  region net J2: 14.281,-1.413 14.275,-1.406 cw(c14.544,-1.182) 14.195,-1.151 14.458,-1.179 14.43,-1.429
  region net J2: 14.579,-1.446 14.586,-1.44 ccw(c14.366,-1.176) 14.708,-1.207 14.458,-1.179 14.43,-1.429
  region net RF: 9.876,0.149 9.883,0.155 cw(c10.128,-0.09) 10.128,0.257 10.128,-0.001 9.876,-0.001
  region net RF: 9.876,-0.151 9.883,-0.157 ccw(c10.128,0.088) 10.128,-0.259 10.128,-0.001 9.876,-0.001
  region net RF: 11.65,0.15 11.644,0.156 ccw(c11.398,-0.089) 11.398,0.258 11.398,0 11.65,0
  region net RF: 11.65,-0.15 11.644,-0.156 cw(c11.398,0.089) 11.398,-0.258 11.398,0 11.65,0
  region net RFC: 11.95,-0.15 11.956,-0.156 ccw(c12.202,0.089) 12.202,-0.258 12.202,0 11.95,0
  region net RFC: 11.95,0.15 11.956,0.156 cw(c12.202,-0.089) 12.202,0.258 12.202,0 11.95,0
  region net RFC: 12.601,-0.258 12.629,-0.258 ccw(c12.629,-0.002) 12.81,-0.183 cw(c12.95,-0.323) 12.95,-0.125 13.026,-0.125 13.026,0 12.601,0
  region net RFC: 12.601,0.258 12.629,0.258 cw(c12.629,0.002) 12.81,0.183 ccw(c12.95,0.323) 12.95,0.125 13.026,0.125 13.026,0 12.601,0
  region net GND: 10.613,-12.238 10.713,-12.213 10.425,-11.675 10.341,-11.704 10.25,-11.795 10.25,-12.1 10.275,-12.1 10.425,-12.25
  region net GND: 10.613,12.238 10.713,12.213 10.425,11.675 10.341,11.704 10.25,11.795 10.25,12.1 10.275,12.1 10.425,12.25
  pour cut-out: 3.2,-5.1 6.6,-5.1 6.6,-8.5 3.2,-8.5
  pour cut-out: 9.506,5.002 9.506,1.747 6.638,1.747 6.638,5.002
  pour cut-out: 8.126,-0.303 8.126,-0.811 8.558,-1.243 9.244,-1.243 9.65,-0.837 9.65,-0.836 9.65,-0.303 9.8,-0.303 9.8,-0.923 9.318,-1.406 8.479,-1.406 7.971,-0.898 7.971,-0.303
  pour cut-out: 7.005,1.07 7.005,0.861 7.118,0.861 7.118,1.07
  region net NetL2_1: 6.548,0.149 6.159,0.099 6.159,-0.1 6.548,-0.151
  pour cut-out: -2.488,2.28 -2.488,1.87 -2.375,1.87 -2.375,2.28
  pour cut-out: 1.053,5.562 0.843,5.562 0.843,5.449 1.053,5.449
  pour cut-out: 3.285,3.885 2.472,3.885 2.472,5.231 3.285,5.231
  pour cut-out: -5.2,3.275 -3.8,3.275 -3.8,4.275 -5.2,4.275
  pour cut-out: 8.8,5.925 8.8,7.325 7.8,7.325 7.8,5.925
Mid-Layer 1:
  pour cut-out: 7.971,-0.407 7.971,-0.898 8.479,-1.406 9.318,-1.406 9.8,-0.923 9.8,-0.407
  pour cut-out: 6.968,0.761 6.968,-0.407 9.305,-0.407 9.686,-0.788 11.3,-0.788 11.3,0.786 9.991,0.786 9.61,0.405 7.603,0.405 7.603,0.761
Mid-Layer 2:
  pour cut-out: 6.968,0.761 6.968,-0.407 9.305,-0.407 9.686,-0.788 11.3,-0.788 11.3,0.786 9.991,0.786 9.61,0.405 7.603,0.405 7.603,0.761
  pour cut-out: 7.971,-0.407 7.971,-0.898 8.479,-1.406 9.318,-1.406 9.8,-0.923 9.8,-0.407

## Silkscreen, mask and mechanical layers (free items; w line width, h text height)
Top Overlay:
  text "ANT1" at 9.404,10.485 h1.5 r153
  text ".PCBRevision" at 14.658,7.217 h1.52 r128
  text "BTN1" at -1.6,-2.35 h1.5 r90
  text "RST" at 11.85,-6.7 h1.5 r90
  text ".PCBNumber" at 11.101,-11.93 h2.03 r52
  text "ANT2" at 6.286,-12.074 h1.5 r27
  text "BTN2" at -1.75,-12.85 h1.5
  text "GND" at -9.201,-13.466 h1.4 r330
  text "VDD" at -6.66,-13.466 h1.4 r330
  text "VBAT" at -4.12,-13.466 h1.4 r330
Bottom Overlay:
  text "nRF54L15 / TAG" at 12.667,-11.435 h2.3 r33
Board Outline:
  the board outline again, w0.1
PCB Info:
  lines w0.1: -16.5,-15.8 -16.5,-16.5 -15.8,-16.5
Bottom Assembly:
  circle w0.1: c-9.25,12 r0.5
  circle w0.1: c-9.25,12 r0.75
  circle w0.1: c-9.25,10 r0.5
  circle w0.1: c-9.25,10 r0.75
  circle w0.1: c-11.25,7 r0.5
  circle w0.1: c-11.25,7 r0.75
  circle w0.1: c-9.25,8 r0.5
  circle w0.1: c-9.25,8 r0.75
  circle w0.1: c-9.25,6 r0.5
  circle w0.1: c-9.25,6 r0.75
  circle w0.1: c-9.25,4 r0.5
  circle w0.1: c-9.25,4 r0.75
  circle w0.1: c-9.25,2 r0.5
  circle w0.1: c-9.25,2 r0.75
  circle w0.1: c-9.25,0 r0.5
  circle w0.1: c-9.25,0 r0.75
  circle w0.1: c-9.25,-2 r0.5
  circle w0.1: c-9.25,-2 r0.75
  circle w0.1: c-9.25,-4 r0.5
  circle w0.1: c-9.25,-4 r0.75
  circle w0.1: c-9.25,-6 r0.5
  circle w0.1: c-9.25,-6 r0.75
  circle w0.1: c-11.25,-7 r0.5
  circle w0.1: c-11.25,-7 r0.75
  circle w0.1: c-9.25,-8 r0.5
  circle w0.1: c-9.25,-8 r0.75
  circle w0.1: c-9.25,-10 r0.75
  circle w0.1: c-9.25,-10 r0.5
Top Impedance:
  lines w0.517: 9.34,-11.091 ccw(c0,0) 11.102,-9.327 ; 9.34,11.091 cw(c0,0) 11.102,9.327 ; 10.138,0 11.39,0 ; 11.729,-8.525 ccw(c0,0) 14.364,-1.985 ; 11.729,8.525 cw(c0,0) 14.364,1.985 ; 12.21,0 12.6,0 ; 14.453,-1.171 ccw(c0,0) 14.486,-0.634 ; 14.453,1.171 cw(c0,0) 14.486,0.634
  text "50 ohm impedance, CPW" at 9.025,-7.45 h1.78 r90
Top Via Capping:
  lines w0.15: -3.7,-13.2 -3.7,-6.2 4.3,-6.2 4.3,-13.2 -3.7,-13.2 ; -3.7,-5.716 -3.7,7.284 11.3,7.284 11.3,-5.716 -3.7,-5.716
Route Tool Path:
  lines w1: -16.934,-1.501 cw(c0,0) -16.934,1.501 ; -16.934,-1.5 -13.8,-1.5 -13.8,-2.4 -16.83,-2.4 ; -16.934,1.5 -13.8,1.5 -13.8,2.4 -16.83,2.4 cw(c0,0) -14.722,8.5 ; -16.83,-2.396 ccw(c0,0) -14.722,-8.5 ; -12.021,-12.021 ccw(c0,0) 12.021,-12.021 ; -12.021,12.021 cw(c0,0) 12.021,12.021 ; 14.722,-8.5 ccw(c0,0) 14.722,8.5

## Text inside footprints (layer, text, board x,y; h text height)
LED1: Top Overlay "+" at 4.525,-9.025 h0.6 r180
LED2: Top Overlay "+" at 4.725,11.275 h0.6 r180